# Altium PCB MPPT_Power_Board.PcbDoc (part 2 of 2)
Units mm, origin at the board's own origin, x right, y up, seen from the top; angles counter-clockwise.
Board outline 137.01 x 102.01 mm, 2 copper layers (Top Layer, Bottom Layer), stack 2.14 mm thick; 111 components, 74 nets, 392 pads, 366 vias.
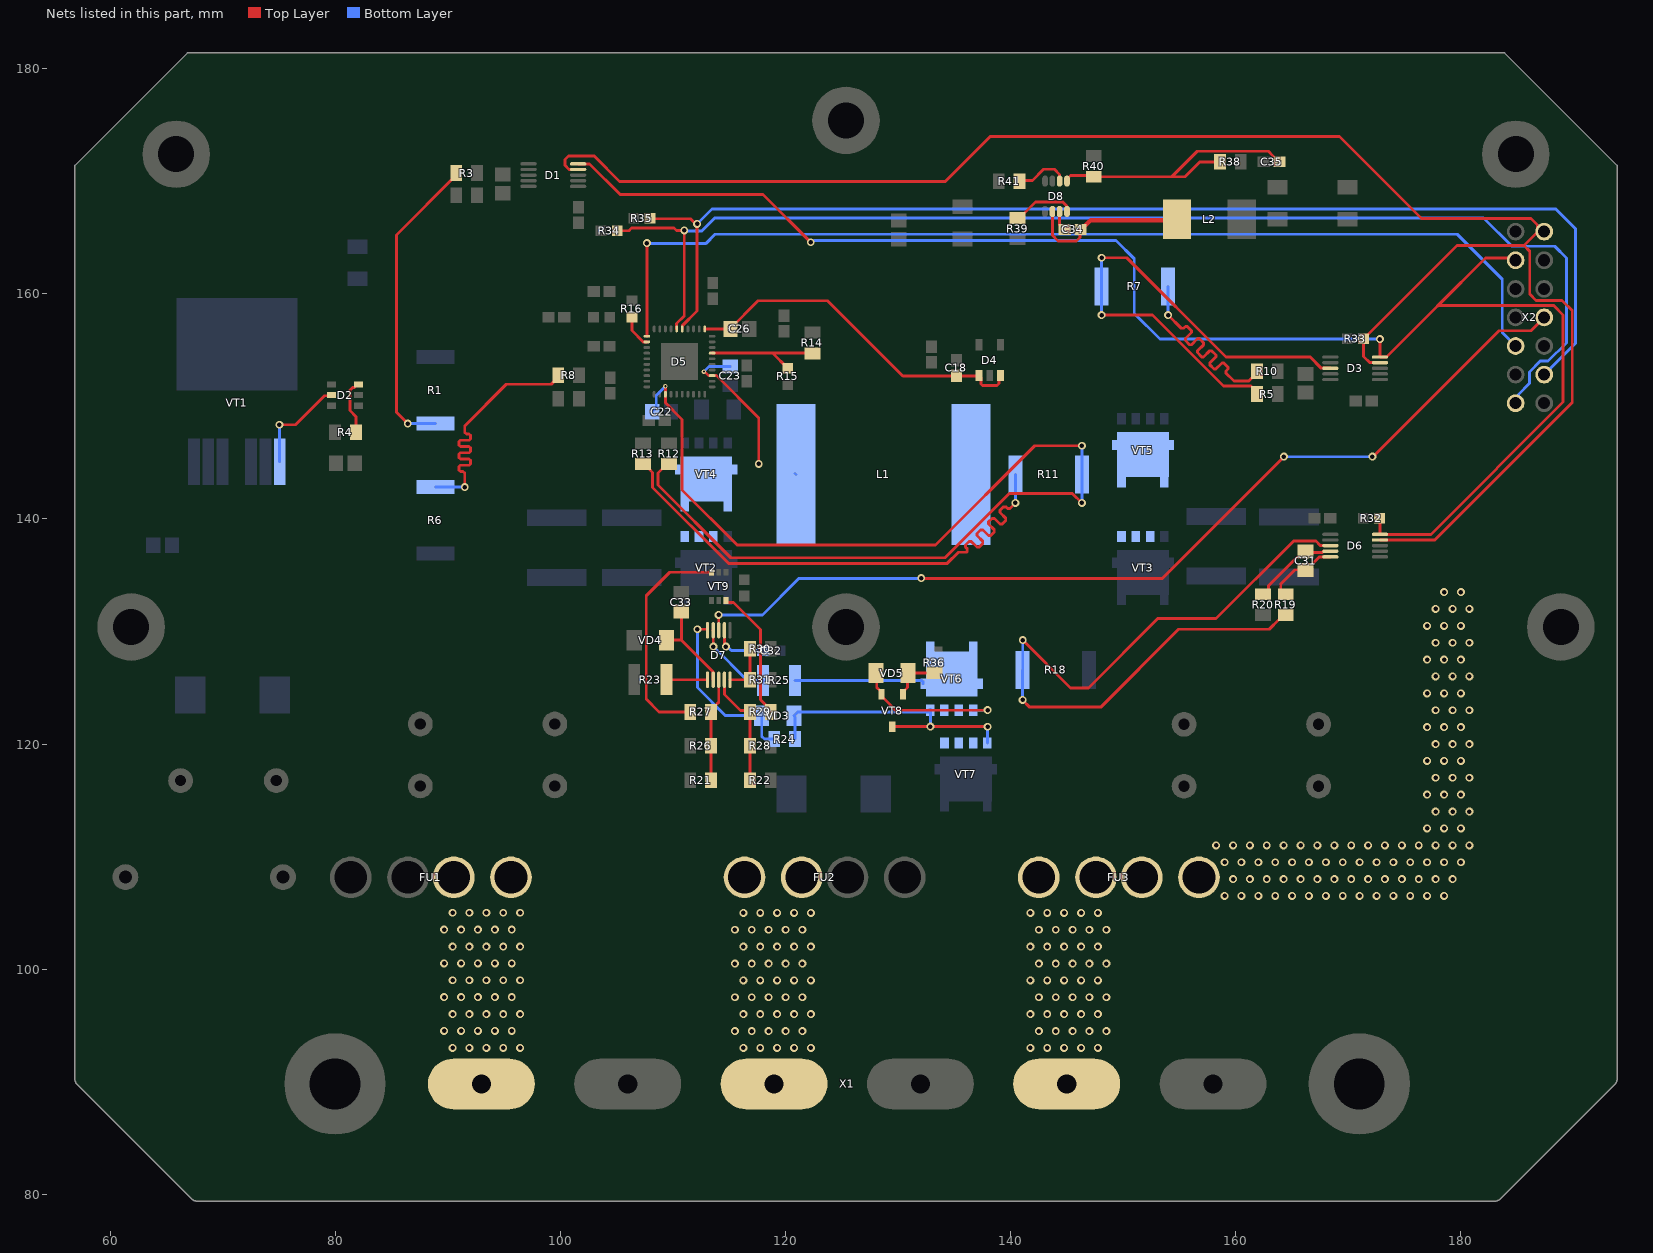
[diagram p2: the nets of this part, all layers, seen from the top]

## Via types
v1: diameter 0.7, hole 0.4, Top Layer to Bottom Layer, 303 vias
v2: diameter 0.7/0.7 (per signal layer), hole 0.4, Top Layer to Bottom Layer, 45 vias
v3: diameter 0.5, hole 0.2, Top Layer to Bottom Layer, 9 vias
v4: diameter 0.4/0.4 (per signal layer), hole 0.2, Top Layer to Bottom Layer, 9 vias

## Nets (pads, with @x,y where several pads share a name; then routed paths per layer and width w, separated by ;. In a path a pad name is that pad's centre, name@x,y a point inside that pad or via, vN(x,y) a via of type N, cw(c..) or ccw(c..) an arc to the next point about the centre after c; other vN are vias at no path point) (continued)
NetC31_1: C31.1 D6.9 R20.1 | length 7.8
  Top Layer w0.254: R20.1@162.425,133.3 162.509,133.3 162.907,133.698 162.907,134.057 165.445,136.596 165.696,136.596 C31.1@166.194,137.094 166.27,137.018 167.705,137.018 167.813,137.125 D6.9@168.4,137.125
NetC31_2: C31.2 D6.10 R19.1 | length 6.6
  Top Layer w0.254: R19.1@164.425,133.3 164.386,133.3 163.988,133.698 163.988,134.206 165.262,135.48 166.158,135.48 C31.2@166.194,135.444 166.269,135.444 166.767,135.942 166.767,135.974 167.409,136.616 168.391,136.616 D6.10@168.4,136.625
NetC32_1: C32.1 D7.7 | length 5
  Top Layer w0.26: D7.7@114.568,130.106 114.568,128.911 114.7,128.778 v2(114.7,128.659)
  Bottom Layer w0.26: v2(114.7,128.659) 114.819,128.659 115.184,128.294 C32.1@118.025,128.294
NetC33_2: C33.2 D7.2 VD4.2 | length 8.6
  Top Layer w0.26: VD4.2@109.416,129.227 110.76,129.227 ; C33.2@110.731,131.769 110.76,131.74 110.76,129.227 ; D7.2@113.567,125.706 113.56,125.714 113.56,126.426 110.76,129.227
NetC34_1: C34.1 D8.7 | length 1.8
  Top Layer w0.254: D8.7@144.351,167.307 144.351,166.093 144.731,165.714 C34.1@144.806,165.714
NetC34_2: C34.2 D8.6 L2.1 | length 14.5
  Top Layer w0.254: D8.6@143.701,167.307 143.701,165.19 144.198,164.694 145.847,164.694 146.16,165.006 146.16,165.668 C34.2@146.206,165.714 C34.2@146.281,165.714
  Top Layer w0.4: C34.2@146.281,165.714 147.117,166.55 L2.1@154.689,166.55
NetC35_2: C35.2 D8.1 R38.2 R40.1 | length 25.4
  Top Layer w0.254: D8.1@145.001,170.007 145.001,170.19 145.323,170.512 147.261,170.512 R40.1@147.384,170.389 154.314,170.389 ; R38.2@158.591,171.725 158.562,171.696 156.8,171.696 155.493,170.389 154.314,170.389 ; C35.2@163.875,171.731 163.794,171.731 163.254,172.271 163.254,172.295 162.895,172.654 156.579,172.654 154.314,170.389
NetD2_3: D2.3 R4.2 | length 4.9
  Top Layer w0.254: R4.2@81.825,147.7 81.822,147.703 81.822,149.089 81.294,149.617 81.294,151.433 81.517,151.656 81.653,151.656 81.656,151.656 81.95,151.95 D2.3@82.075,151.95
NetD2_5: D2.5 VT1.1 | length 9
  Top Layer w0.254: v2(75.038,148.362) 76.461,148.362 79.043,150.944 79.619,150.944 D2.5@79.675,151
  Bottom Layer w0.254: v2(75.038,148.362) 75.049,148.351 75.049,145.086 VT1.1@75.06,145.075
NetD3_8: D3.8 R1.2 R3.2 R5.1 R6.1 R7.1 R8.1 | length 97
  Top Layer w0.254: v2(86.434,148.466) 85.434,149.467 85.434,165.232 90.75,170.549 R3.2@90.75,170.724 ; v2(91.5,142.827) 91.5,144.062 91.351,144.21 91.111,144.21 91,144.321 91,144.654 91.111,144.764 91.889,144.764 92,144.875 92,145.208 91.889,145.318 91.111,145.318 91,145.429 91,145.762 91.111,145.872 91.889,145.872 92,145.983 92,146.316 91.889,146.426 91.111,146.426 91,146.537 91,146.87 91.111,146.98 91.889,146.98 92,147.091 92,147.424 91.889,147.534 91.649,147.534 91.5,147.683 91.5,148.256 91.5,148.264 95.192,151.956 99.177,151.956 99.792,152.571 R8.1@99.792,152.775 ; v2(148.075,158.1) 152.605,158.1 158.898,151.807 161.338,151.807 161.879,151.266 R5.1@161.879,151.091 ; v2(148.075,163.2) 150.311,163.2 159.135,154.376 166.607,154.376 167.595,153.388 168.391,153.388 D3.8@168.4,153.379
  Bottom Layer w0.25: v2(86.434,148.466) R1.2@88.891,148.466 ; R6.1@88.902,142.827 v2(91.5,142.827) ; v2(148.075,158.1) R7.1@148.075,160.65
  Bottom Layer w0.254: R1.2@88.891,148.466 R1.2@88.9,148.475 ; R6.1@88.9,142.825 R6.1@88.902,142.827 ; R7.1@148.075,160.65 v2(148.075,163.2)
NetD5_12: D5.12 R16.1 | length 2.9
  Top Layer w0.254: R16.1@106.35,157.925 106.35,156.735 107.36,155.725 D5.12@107.675,155.725
NetD5_37: D5.37 R14.2 R15.1 | length 10.8
  Top Layer w0.254: D5.37@113.475,154.725 118.85,154.725 R15.1@120.2,153.375 ; 118.85,154.723 122.366,154.723 R14.2@122.386,154.703
NetD6_8: D6.8 R18.1 R19.2 R25.2 VT6.2 | length 78.8
  Top Layer w0.254: v2(141.05,123.92) 141.698,123.272 147.996,123.272 154.921,130.198 162.976,130.198 163.83,131.052 164.027,131.052 R19.2@164.425,131.45 R19.2@164.6,131.45 ; v2(141.069,129.229) 145.312,124.986 146.917,124.986 153.067,131.136 158.253,131.136 165.142,138.025 167.11,138.025 167.5,137.634 168.391,137.634 D6.8@168.4,137.625
  Bottom Layer w0.254: R25.2@120.85,125.65 132.105,125.65 132.225,125.53 VT6.2@132.225,125.348 ; v2(141.05,123.92) R18.1@141.05,126.575 141.069,126.594 v2(141.069,129.229)
NetD7_1: D7.1 R23.2 | length 3.7
  Top Layer w0.254: R23.2@109.411,125.714 109.419,125.706 D7.1@113.068,125.706
NetD7_3: D7.3 R21.2 R26.1 R27.1 | length 9.2
  Top Layer w0.254: R21.2@113.387,116.771 R26.1@113.387,119.843 R27.1@113.387,122.846 113.785,123.244 113.785,123.425 114.068,123.707 D7.3@114.068,125.706
NetD7_4: D7.4 R22.2 R28.1 R29.1 | length 10.3
  Top Layer w0.254: D7.4@114.568,125.706 114.576,125.697 114.576,124.406 116,122.983 116.672,122.983 R29.1@116.825,122.83 ; R22.2@116.841,116.771 R28.1@116.841,119.843 R29.1@116.841,122.846
NetD7_5: D7.5 R30.1 R31.1 | length 4.5
  Top Layer w0.254: D7.5@115.068,125.706 116.834,125.706 R31.1@116.841,125.714
  Top Layer w0.26: R31.1@116.841,125.714 R30.1@116.841,128.46
NetD7_9: D7.9 R25.1 | length 7.1
  Top Layer w0.25: v2@113.576,128.676 D7.9@113.576,130.097
  Top Layer w0.254: D7.9@113.567,130.106 D7.9@113.576,130.097
  Bottom Layer w0.254: v2(113.593,128.659) 116.603,125.65 R25.1@118,125.65
NetD7_10: D7.10 R24.1 VD3.2 | length 15.9
  Top Layer w0.25: v2(112.171,130.195) D7.10@113.046,130.195
  Top Layer w0.254: D7.10@113.046,130.195 113.055,130.187 D7.10@113.055,130.119
  Bottom Layer w0.254: v2(112.171,130.195) 112.171,125.018 114.672,122.517 VD3.2@117.88,122.517 117.88,120.671 118.114,120.437 R24.1@119,120.437
NetD8_2: D8.2 R41.2 | length 4.8
  Top Layer w0.254: R41.2@140.781,170 140.84,170.06 141.923,170.06 142.923,171.059 143.878,171.059 144.332,170.606 144.332,170.026 D8.2@144.351,170.007
NetD8_8: D8.8 R39.1 | length 5.6
  Top Layer w0.254: R39.1@140.606,166.721 140.781,166.721 142.21,168.15 144.625,168.15 144.954,167.821 144.954,167.354 D8.8@145.001,167.307
NetFU1_1: FU1.1 X1.1
  other v1: 90.421,93.01 91.921,93.01 93.421,93.01 94.921,93.01 96.421,93.01 89.671,94.51 91.171,94.51 92.671,94.51 94.171,94.51 95.671,94.51 90.421,96.01 91.921,96.01 93.421,96.01 94.921,96.01 96.421,96.01 89.671,97.51 91.171,97.51 92.671,97.51 94.171,97.51 95.671,97.51 90.421,99.01 91.921,99.01 93.421,99.01 94.921,99.01 96.421,99.01 89.671,100.51 91.171,100.51 92.671,100.51 94.171,100.51 95.671,100.51 90.421,102.01 91.921,102.01 93.421,102.01 94.921,102.01 96.421,102.01 89.671,103.51 91.171,103.51 92.671,103.51 94.171,103.51 95.671,103.51 90.421,105.01 91.921,105.01 93.421,105.01 94.921,105.01 96.421,105.01
NetFU2_1: FU2.1 X1.3
  other v1: 116.25,93 117.75,93 119.25,93 120.75,93 122.25,93 115.5,94.5 117,94.5 118.5,94.5 120,94.5 121.5,94.5 116.25,96 117.75,96 119.25,96 120.75,96 122.25,96 115.5,97.5 117,97.5 118.5,97.5 120,97.5 121.5,97.5 116.25,99 117.75,99 119.25,99 120.75,99 122.25,99 115.5,100.5 117,100.5 118.5,100.5 120,100.5 121.5,100.5 116.25,102 117.75,102 119.25,102 120.75,102 122.25,102 115.5,103.5 117,103.5 118.5,103.5 120,103.5 121.5,103.5 116.25,105 117.75,105 119.25,105 120.75,105 122.25,105
NetFU3_1: FU3.1 X1.5
  other v1: 141.75,93 143.25,93 144.75,93 146.25,93 147.75,93 142.5,94.5 144,94.5 145.5,94.5 147,94.5 148.5,94.5 141.75,96 143.25,96 144.75,96 146.25,96 147.75,96 142.5,97.5 144,97.5 145.5,97.5 147,97.5 148.5,97.5 141.75,99 143.25,99 144.75,99 146.25,99 147.75,99 142.5,100.5 144,100.5 145.5,100.5 147,100.5 148.5,100.5 141.75,102 143.25,102 144.75,102 146.25,102 147.75,102 142.5,103.5 144,103.5 145.5,103.5 147,103.5 148.5,103.5 141.75,105 143.25,105 144.75,105 146.25,105 147.75,105
NetFU3_2: FU3.2 R7.2 R10.1 | length 19.2
  Top Layer w0.254: v2(153.975,158.1) 155.145,156.93 155.356,156.93 155.523,157.097 155.685,157.097 156.063,156.719 156.063,156.557 155.518,156.012 155.518,155.85 155.896,155.472 156.058,155.472 156.603,156.017 156.766,156.017 157.144,155.638 157.144,155.476 156.599,154.931 156.599,154.769 156.977,154.391 157.139,154.391 157.684,154.936 157.846,154.936 158.224,154.558 158.224,154.396 157.679,153.851 157.679,153.689 158.057,153.311 158.219,153.311 158.764,153.856 158.926,153.856 159.305,153.478 159.305,153.315 159.137,153.148 159.137,152.938 159.736,152.339 159.828,152.247 161.144,152.247 161.43,152.533 161.481,152.533 161.879,152.931 R10.1@161.879,153.106
  Bottom Layer w0.25: v2(153.975,158.1) R7.2@153.975,160.65
  other v1: 159,106.5 160.5,106.5 162,106.5 163.5,106.5 165,106.5 166.5,106.5 168,106.5 169.5,106.5 171,106.5 172.5,106.5 174,106.5 175.5,106.5 177,106.5 178.5,106.5 159.75,108 161.25,108 162.75,108 164.25,108 165.75,108 167.25,108 168.75,108 170.25,108 171.75,108 173.25,108 174.75,108 176.25,108 177.75,108 179.25,108 159,109.5 160.5,109.5 162,109.5 163.5,109.5 165,109.5 166.5,109.5 168,109.5 169.5,109.5 171,109.5 172.5,109.5 174,109.5 175.5,109.5 177,109.5 178.5,109.5 180,109.5 158.25,111 159.75,111 161.25,111 162.75,111 164.25,111 165.75,111 167.25,111 168.75,111 170.25,111 171.75,111 173.25,111 174.75,111 176.25,111 177.75,111 179.25,111 180.75,111 177,112.5 178.5,112.5 180,112.5 177.75,114 179.25,114 180.75,114 177,115.5 178.5,115.5 180,115.5 177.75,117 179.25,117 180.75,117 177,118.5 178.5,118.5 180,118.5 177.75,120 179.25,120 180.75,120 177,121.5 178.5,121.5 180,121.5 177.75,123 179.25,123 180.75,123 177,124.5 178.5,124.5 180,124.5 177.75,126 179.25,126 180.75,126 177,127.5 178.5,127.5 180,127.5 177.75,129 179.25,129 180.75,129 177,130.5 178.5,130.5 180,130.5 177.75,132 179.25,132 180.75,132 178.5,133.5 180,133.5
NetL1_2: L1.2 R11.1 R13.1 | length 48
  Top Layer w0.254: R13.1@107.325,144.875 107.5,144.875 107.898,144.477 107.898,144.412 108.189,144.12 108.189,142.782 114.92,136.051 134.369,136.051 135.359,137.041 136.046,137.041 136.135,137.13 136.135,137.341 135.989,137.487 135.989,137.692 136.297,137.999 136.501,137.999 137.004,137.496 137.209,137.496 137.516,137.804 137.516,138.008 137.013,138.511 137.013,138.715 137.321,139.023 137.525,139.023 138.028,138.52 138.232,138.52 138.54,138.827 138.54,139.032 138.037,139.535 138.037,139.739 138.344,140.047 138.549,140.047 139.052,139.544 139.256,139.544 139.563,139.851 139.563,140.056 139.061,140.558 139.061,140.763 139.368,141.07 139.573,141.07 139.719,140.924 139.929,140.924 v2(140.425,141.42)
  Bottom Layer w0.254: v2(140.425,141.42) R11.1@140.425,143.95
NetR24_2: R24.2 VD3.1 VT6.1 VT7.1 VT8.3 | length 25.8
  Top Layer w0.254: VT8.3@129.475,121.525 129.503,121.553 v2(132.875,121.553) 132.887,121.542 137.938,121.542 v2(137.949,121.53)
  Bottom Layer w0.25: VT7.1@137.93,120.095 137.949,120.114 v2(137.949,121.53)
  Bottom Layer w0.254: R24.2@120.85,120.437 120.85,122.407 VD3.1@120.74,122.517 121.077,122.855 132.695,122.855 VT6.1@132.845,123.005 ; v2@132.86,121.568 VT6.1@132.86,122.99
  Bottom Layer w0.4: VT6.1@132.845,123.005 VT6.1@132.86,122.99 ; v2@132.86,121.568 v2(132.875,121.553)
NetR27_2: R27.2 VT9.6 | length 20.2
  Top Layer w0.254: R27.2@111.537,122.846 108.763,122.846 107.625,123.984 107.625,133.164 109.717,135.256 VT9.6@113.417,135.256
NetR29_2: R29.2 VT9.3 | length 11.9
  Top Layer w0.254: VT9.3@114.717,132.756 114.717,132.666 114.8,132.583 115.376,132.583 117.774,130.185 117.774,123.939 118.691,123.021 R29.2@118.691,122.846
NetR36_1: R36.1 VD5.2 VT8.1 | length 4.4
  Top Layer w0.254: VT8.1@130.425,124.425 130.425,124.62 130.505,124.7 130.508,124.7 130.842,125.034 130.842,126.262 VD5.2@130.88,126.3 R36.1@133.225,126.3
NetVD5_1: VD5.1 VT6.3 VT7.3 VT8.2 | length 13.5
  Top Layer w0.254: VD5.1@128.02,126.3 128.099,126.221 128.099,125.034 128.433,124.7 128.445,124.7 128.525,124.62 VT8.2@128.525,124.425 128.525,124.23 128.678,124.077 128.693,124.077 129.765,123.005 v2(137.949,123.005)
  Bottom Layer w0.254: VT6.3@136.655,123.005 v2(137.949,123.005)
NFLT: D5.11 X2.9 | length 92.4
  Top Layer w0.254: D5.11@107.675,156.225 v2@107.675,164.181
  Bottom Layer w0.254: v2(107.675,164.5) 107.727,164.448 112.902,164.448 113.742,165.288 179.669,165.288 183.669,161.288 183.669,156.543 X2.9@184.856,155.356
NPGD: D7.8 X2.8 | length 85.7
  Top Layer w0.25: D7.8@114.06,130.113 v2@114.06,131.455
  Top Layer w0.254: D7.8@114.06,130.113 D7.8@114.068,130.106 ; v2(132.05,134.745) 132.086,134.709 153.459,134.709 v2(164.275,145.525) ; v2(172.125,145.525) 172.195,145.525 183.38,156.71 186.21,156.71 X2.8@187.396,157.896
  Bottom Layer w0.254: v2(114.053,131.462) 117.937,131.462 121.164,134.689 131.993,134.689 v2(132.05,134.745) ; v2(164.275,145.525) v2(172.125,145.525)
SCL_1: D1.5 D3.5 D6.5 R32.1 X2.3 | length 140.2
  Top Layer w0.254: D1.5@101.571,171.54 102.576,171.54 105.307,168.809 118.003,168.809 v2(122.236,164.577) ; R32.1@172.768,140.06 172.8,140.028 D6.5@172.8,138.625 177.334,138.625 189.079,150.369 189.079,158.123 188.261,158.941 177.937,158.941 ; v2(172.8,155.975) D3.5@172.8,154.379 173.375,154.379 177.779,158.783 177.937,158.941 ; X2.3@184.604,162.723 X2.3@184.856,162.976 184.645,163.187 182.183,163.187 177.937,158.941
  Bottom Layer w0.254: v2(122.236,164.577) 122.357,164.577 122.511,164.731 149.349,164.731 150.975,163.105 150.975,158.255 153.256,155.975 v2(172.8,155.975)
SCL_2: D5.6 R34.1 X2.13 | length 110.4
  Top Layer w0.254: R34.1@105.046,165.597 106.079,165.597 106.327,165.846 110.091,165.846 110.308,165.629 v2@110.992,165.629 ; D5.6@110.325,156.875 110.325,157.353 111,158.028 v2@111,165.31
  Bottom Layer w0.254: v2(111,165.621) 111.045,165.576 112.552,165.576 113.711,166.734 182.011,166.734 184.525,164.22 188.329,164.22 189.367,163.183 189.367,155.636 187.746,154.015 187.049,154.015 186.096,153.062 186.096,152.049 185.109,151.062 185.109,150.529 X2.13@184.856,150.276
SDA_1: D1.4 D3.4 D6.4 R33.1 X2.2 | length 156.7
  Top Layer w0.254: D1.4@101.571,171.04 101.562,171.049 100.772,171.049 100.406,171.415 100.406,171.926 100.709,172.23 102.999,172.23 105.247,169.982 134.191,169.982 138.184,173.975 169.201,173.975 176.49,166.687 186.226,166.687 186.811,166.101 186.811,165.486 185.601,164.276 ; R33.1@171.347,155.99 171.347,154.44 171.898,153.888 172.791,153.888 D3.4@172.8,153.879 ; R33.1@171.356,155.999 171.698,156.341 171.704,156.341 179.639,164.276 185.601,164.276 ; D6.4@172.8,138.125 177.673,138.125 189.883,150.335 189.883,158.51 188.982,159.411 186.669,159.411 186.108,159.971 186.108,163.769 185.601,164.276
SDA_2: D5.5 R35.1 X2.12 | length 107.4
  Top Layer w0.254: R35.1@107.958,166.714 108.005,166.668 111.551,166.668 112.019,166.2 v2(112.14,166.2) ; D5.5@110.825,156.875 110.825,157.15 112.14,158.465 v2@112.14,165.87
  Bottom Layer w0.254: v2(112.14,166.2) 113.479,167.538 188.418,167.538 190.191,165.765 190.191,155.611 X2.12@187.396,152.816
SW1: C22.2 D5.23 R11.2 R12.1 VT3.3 VT5.2 | length 104.3
  Top Layer w0.254: v4(109.325,151.785) D5.23@109.325,151.075 109.325,150.31 110.807,148.828 110.807,142.568 115.708,137.666 133.305,137.666 142.137,146.498 v2@146.321,146.498 ; R12.1@109.65,144.875 109.475,144.875 108.668,144.068 108.668,143.008 115.13,136.546 134.15,136.546 139.871,142.268 145.475,142.268 v2(146.323,141.42)
  Bottom Layer w0.254: C22.2@108.155,149.525 108.511,149.88 108.511,150.971 v4(109.325,151.785) ; v2(146.323,141.42) 146.323,143.952 v2(146.323,146.5)
SW2: C23.2 D5.33 L1.1 VT2.3 VT4.2 | length 13.3
  Top Layer w0.254: v4(112.744,153.09) 112.783,153.09 113.146,152.727 113.473,152.727 D5.33@113.475,152.725 113.867,152.725 117.616,148.976 v2@117.616,144.881
  Bottom Layer w0.254: v4(112.744,153.09) 113.202,153.548 C23.2@115.089,153.548 ; L1.1@120.85,144.025 L1.1@120.925,143.95
  other v2: 117.622,144.875
VCC1: C18.2 C26.1 D4.1 D4.3 D5.1 | length 31.4
  Top Layer w0.254: D5.1@112.825,156.875 115.05,156.875 117.555,159.38 123.737,159.38 130.417,152.7 135.179,152.7 C18.2@135.183,152.704 137.158,152.704 D4.1@137.183,152.729 137.356,152.556 137.356,152.009 137.505,151.86 138.78,151.86 138.951,152.031 138.951,152.597 D4.3@139.083,152.729
pads on no net: D4.4 D5.26 D5.34 D5.35 D5.39

## Polygon pours and split planes (outlines as drawn)
AGND on Bottom Layer "AGND_L02_P046" (solid, remove dead copper, pour order 46): 67.688,180.387 67.488,180.387 58.025,170.925 58.062,90.212 58.15,90.125 67.707,80.567 67.722,80.552 182.852,80.552 192.669,90.76 192.669,171.175 192.669,171.35 183.631,180.387
SW2 on Bottom Layer "SW2_L02_P016" (solid, remove dead copper, pour order 16): 109.979,139.534 cw(c103.073,139.534) 109.97,139.175 ccw(c111.387,139.101) 110.409,138.072 ccw(c111.157,139.121) 111.376,137.852 113.674,137.852 ccw(c113.769,138.398) 114.088,137.944 ccw(c113.599,138.348) 114.23,138.408 114.23,139.572 cw(c115.042,139.572) 114.468,140.145 cw(c115.133,139.48) 115.133,140.421 115.521,140.421 ccw(c115.521,141.087) 115.992,140.616 116.061,140.685 ccw(c115.726,141.02) 116.199,141.02 116.199,144.581 ccw(c115.281,144.581) 115.93,145.23 ccw(c115.249,144.55) 115.249,145.512 110.719,145.512 ccw(c110.719,144.725) 110.162,145.282 ccw(c110.603,144.841) 109.979,144.841 109.979,140.044
SW1 on Bottom Layer "SW1_L02_P025" (solid, remove dead copper, pour order 25): 146.776,145.622 147.078,145.622 ccw(c147.011,147.013) 148.042,146.077 148.927,147.279 cw(c149.859,146.347) 149.859,147.665 154.141,147.665 cw(c154.141,146.613) 154.884,147.357 cw(c154.584,147.057) 155.009,147.056 155.009,143.07 cw(c154.215,143.07) 154.776,142.509 cw(c154.502,142.783) 154.502,142.396 153.783,142.396 ccw(c153.782,141.99) 153.496,142.277 ccw(c154.722,141.051) 152.988,141.051 152.988,138.111 cw(c152.674,138.111) 152.896,137.889 cw(c152.818,137.967) 152.817,137.857 149.37,137.857 cw(c149.37,138.502) 148.913,138.046 cw(c149.85,138.983) 148.525,138.983 148.525,140.684 ccw(c147.869,140.684) 148.376,141.1 147.692,141.934 ccw(c146.833,141.026) 146.775,142.275 146.775,145.625
BATT_OUT on Bottom Layer "BATT_OUT_L02_P030" (solid, remove dead copper, pour order 30): 147.35,128.25 148.022,128.25 cw(c148.022,126.373) 149.35,127.7 151.056,125.994 ccw(c152.852,127.79) 152.852,125.25 166.025,125.25 ccw(c162.482,130.825) 168.673,128.522 ccw(c163.548,128.064) 167.825,130.925 ccw(c163.77,125.518) 164.732,132.208 149.771,132.208 cw(c149.771,133.029) 149.19,132.449 cw(c150.33,133.588) 148.718,133.588 148.718,136.296 cw(c149.318,136.296) 148.894,136.72 cw(c149.49,136.124) 149.49,136.967 170.481,136.967 cw(c170.481,134.428) 172.277,136.223 173.185,135.315 cw(c171.39,133.519) 173.929,133.519 173.929,123.456 cw(c171.39,123.456) 173.185,121.66 172.044,120.519 cw(c170.248,122.314) 170.248,119.775 154.57,119.775 cw(c154.57,127.187) 149.329,121.946 cw(c150.908,123.525) 148.675,123.525 ccw(c146.77,123.261) 148.1,124.65 ccw(c146.75,122.281) 147.508,124.9 147.35,124.9 147.35,128.247
BATT_IN on Bottom Layer "BATT_IN_L02_P036" (solid, remove dead copper, pour order 36): 123.656,108.065 123.656,115.879 cw(c126.196,115.879) 124.4,117.675 124.983,118.258 cw(c126.779,116.462) 126.779,119.002 138.279,119.002 cw(c138.279,117.38) 139.425,118.527 cw(c138.92,118.021) 139.635,118.021 139.635,114.447 cw(c138.49,114.447) 139.3,113.638 cw(c138.389,114.549) 138.389,113.261 133.517,113.261 ccw(c133.517,112.16) 132.738,112.938 132.675,112.875 ccw(c133.171,112.379) 132.469,112.379 132.469,107.385 cw(c129.929,107.385) 131.725,105.589 131.534,105.397 cw(c130.893,106.038) 130.893,105.132 125.332,105.132 cw(c125.332,106.885) 124.092,105.645 123.991,105.746 cw(c124.795,106.551) 123.658,106.551 123.658,108.53
DC/DC_IN on Bottom Layer "DC/DC_IN_L02_P033" (solid, pour order 33): 87.225,136.5 cw(c85.113,136.5) 86.606,135.006 84.094,132.494 ccw(c85.89,130.698) 83.35,130.698 83.35,122.175 ccw(c85.342,122.175) 83.933,120.767 84.656,120.044 ccw(c86.452,121.84) 86.452,119.3 100.448,119.3 ccw(c100.448,121.84) 102.244,120.044 102.925,120.725 ccw(c102.201,121.449) 103.225,121.449 103.225,129.448 cw(c105.765,129.448) 103.969,131.244 104.097,131.372 cw(c105.893,129.576) 105.893,132.116 115.115,132.116 ccw(c115.115,133.228) 115.902,132.442 ccw(c115.368,132.976) 116.123,132.976 116.123,136.73 ccw(c115.619,136.73) 115.975,137.087 115.865,137.197 ccw(c115.642,136.975) 115.642,137.29 107.563,137.29 107.557,137.284 107.553,137.288 97.68,137.288 ccw(c97.68,136.22) 96.925,136.975 ccw(c98.434,135.466) 96.3,135.466 96.3,126.599 cw(c94.251,126.599) 95.7,125.15 cw(c94.915,125.935) 94.915,124.825 89.45,124.825 cw(c89.45,125.489) 88.981,125.019 88.494,125.506 cw(c90.29,127.302) 87.75,127.302 87.75,129.925 cw(c89.259,129.925) 88.192,130.992 89.831,132.631 ccw(c88.035,134.427) 90.575,134.427 90.575,136.5
SW2 on Bottom Layer "SW2_L02_P019" (solid, remove dead copper, pour order 19): 115.133,140.421 116.152,140.421 cw(c116.152,137.881) 117.948,139.677 118.1,139.525 cw(c116.772,138.197) 118.65,138.197 118.65,138.079 ccw(c119.504,138.079) 118.9,137.475 ccw(c119.322,137.897) 119.322,137.3 122.734,137.3 ccw(c122.734,137.641) 122.975,137.4 ccw(c122.794,137.581) 123.05,137.581 123.05,150.036 ccw(c122.111,150.036) 122.775,150.7 ccw(c122.253,150.178) 122.253,150.916 119.688,150.916 ccw(c119.688,149.837) 118.925,150.6 ccw(c120.268,149.257) 118.369,149.257 118.369,147.367 cw(c116.683,147.367) 117.875,146.175 cw(c116.195,147.855) 116.195,145.479 115.511,145.479 115.511,141.55 cw(c113.908,141.55) 115.041,140.416
NetD6_8 on Bottom Layer "NETD6_8_L02_P035" (solid, pour order 35): 140.634,128.249 139.61,128.249 cw(c139.61,129.96) 138.4,128.75 ccw(c136.671,127.021) 136.671,129.466 133.096,129.466 ccw(c133.096,127.931) 132.01,129.017 ccw(c132.817,128.073) 131.579,128.169 131.579,125.239 ccw(c132.857,125.355) 132.035,124.369 132.129,124.275 ccw(c132.847,124.751) 132.676,123.907 137.12,123.907 ccw(c136.948,125.285) 138.044,124.432 cw(c139.174,123.303) 139.174,124.9 140.625,124.9 140.625,128.25
NetC2_2 on Bottom Layer "NETC2_2_L02_P039" (solid, remove dead copper, pour order 39): 88.309,108.103 88.309,110.207 ccw(c86.657,110.207) 87.825,111.375 ccw(c86.376,109.926) 86.376,111.975 80.477,111.975 cw(c80.477,114.515) 78.681,112.719 78.1,113.3 cw(c78.885,114.085) 77.775,114.085 77.775,135.698 ccw(c75.235,135.698) 77.031,137.494 75.034,139.491 cw(c76.83,141.287) 74.29,141.287 74.29,147.251 ccw(c73.186,147.251) 73.967,148.033 ccw(c73.261,147.327) 73.261,148.325 67.28,148.325 ccw(c67.28,146.02) 65.65,147.65 ccw(c66.254,147.046) 65.4,147.046 65.4,137.352 ccw(c67.94,137.352) 66.144,135.556 69.731,131.969 cw(c67.935,130.173) 70.475,130.173 70.475,106.802 ccw(c73.015,106.802) 71.219,105.006 72.225,104 ccw(c73.432,105.207) 73.432,103.5 85.323,103.5 ccw(c85.323,106.04) 87.119,104.244 87.56,104.685 ccw(c85.764,106.481) 88.304,106.481 88.304,108.094
NetVD5_1 on Bottom Layer "NETVD5_1_L02_P041" (solid, remove dead copper, pour order 41): 133.489,123.013 133.489,123.321 cw(c133.769,123.321) 133.571,123.518 cw(c133.941,123.249) 133.87,123.701 136.989,123.701 cw(c136.925,123.254) 137.287,123.525 cw(c137.172,123.409) 137.334,123.409 137.334,119.778 cw(c136.995,119.778) 137.235,119.538 cw(c136.826,119.947) 136.826,119.368 133.916,119.368 cw(c133.916,119.834) 133.587,119.505 cw(c133.824,119.741) 133.489,119.741 133.489,123.031
NetFU3_2 on Bottom Layer "NETFU3_2_L02_P037" (solid, remove dead copper, pour order 37): 154.4,162.325 155.273,162.325 ccw(c155.273,162.752) 155.575,162.45 cw(c157.265,160.76) 157.265,163.15 178.868,163.15 cw(c178.868,161.443) 180.075,162.65 181.331,161.394 cw(c179.535,159.598) 182.075,159.598 182.075,109.077 cw(c179.535,109.077) 181.331,107.281 180.144,106.094 cw(c178.348,107.89) 178.348,105.35 151.714,105.35 cw(c151.714,107.353) 150.298,105.937 cw(c151.473,107.112) 149.811,107.112 149.811,109.398 cw(c152.351,109.398) 150.555,111.195 150.829,111.468 cw(c152.289,110.008) 152.289,112.073 173.071,112.073 ccw(c173.071,114.613) 174.867,112.817 175.95,113.9 ccw(c175.407,114.443) 176.175,114.443 176.175,154.937 ccw(c173.635,154.937) 175.431,156.733 174.608,157.556 ccw(c172.812,155.76) 172.812,158.3 156.886,158.3 cw(c156.886,159.836) 155.8,158.75 ccw(c155.257,158.207) 155.257,158.975 154.425,158.975 154.425,162.265 ccw(c154.34,162.265)
NetL1_2 on Bottom Layer "NETL1_2_L02_P021" (solid, remove dead copper, pour order 21): 136,137.325 137.992,137.325 ccw(c137.992,137.786) 138.318,137.46 ccw(c137.783,137.995) 138.539,137.995 138.539,141.288 cw(c139.478,141.288) 138.814,141.952 cw(c139.606,141.16) 139.606,142.28 139.955,142.28 139.955,145.62 139.771,145.62 cw(c139.771,146.746) 138.975,145.95 cw(c140.001,146.976) 138.55,146.976 138.55,150.098 ccw(c138.123,150.098) 138.425,150.4 ccw(c137.843,149.818) 137.843,150.641 134.97,150.641 ccw(c134.97,149.828) 134.395,150.403 134.334,150.342 ccw(c134.76,149.916) 134.157,149.916 134.157,138.02 ccw(c134.812,138.02) 134.349,137.557 ccw(c134.91,138.118) 134.91,137.325 136,137.325
NetD3_8 on Bottom Layer "NETD3_8_L02_P010" (solid, remove dead copper, pour order 10): 90.673,147.269 cw(c91.199,146.811) 90.889,147.436 ccw(c91.515,148.154) 91.449,147.204 91.515,147.204 ccw(c91.635,152.307) 95.109,148.566 ccw(c91.876,150.891) 95.825,151.4 95.825,159.15 98.431,162.456 cw(c100.227,160.66) 100.227,163.2 144.893,163.2 cw(c144.893,161.494) 146.1,162.7 ccw(c147.005,163.605) 147.005,162.325 147.724,162.325 147.724,158.978 147.027,158.978 ccw(c147.026,157.775) 146.175,158.625 cw(c144.908,159.892) 144.908,158.1 103.577,158.1 ccw(c103.577,155.561) 101.781,157.356 101.4,156.975 101.4,146.752 cw(c98.861,146.752) 100.656,144.956 100.521,144.821 cw(c98.902,146.438) 98.902,144.15 92.2,144.15 92.2,144.149 91.448,144.149 90.691,144.149 ccw(c89.234,144.271) 90.436,145.103 90.763,146.451 90.691,146.99 cw(c91.383,147.175)
NetD3_8 on Bottom Layer "NETD3_8_L02_P009" (solid, remove dead copper, pour order 9): 87.225,147.922 cw(c86.628,147.922) 87.05,147.5 ccw(c88.076,146.474) 86.625,146.474 86.625,144.791 ccw(c87.991,144.791) 87.025,143.825 cw(c86.542,143.342) 87.225,143.342 87.225,143.225 90.575,143.225 90.575,143.438 cw(c91.087,143.438) 90.725,143.8 ccw(c89.639,144.886) 91.175,144.886 91.175,146.62 ccw(c89.895,146.62) 90.8,147.525 cw(c91.342,148.067) 90.576,148.067 90.576,148.125 87.225,148.125
NetC4_1 on Bottom Layer "NETC4_1_L02_P002" (solid, remove dead copper, pour order 2): 64.975,152.25 64.975,159.675 cw(c68.057,159.392) 68.34,162.475 88.885,162.475 cw(c88.885,159.935) 91.425,159.935 91.425,159.675 90.575,154.875 87.2,154.875 ccw(c86.375,154.875) 86.375,155.7 79.19,155.7 ccw(c79.401,153.186) 76.887,152.975 76.887,151.563 cw(c76.385,151.562) 76.385,151.06 66.165,151.06 cw(c66.165,152.25)
AGND on Top Layer "AGND_L01_P048" (solid, remove dead copper, pour order 48): 67.689,180.388 67.488,180.388 58.025,170.926 58.062,90.213 58.15,90.125 67.708,80.568 67.722,80.553 182.852,80.553 192.669,90.761 192.669,171.176 192.669,171.351 183.632,180.388
NetFU3_2 on Top Layer "NETFU3_2_L01_P044" (solid, remove dead copper, pour order 44): 182.075,109.077 cw(c179.536,109.077) 181.331,107.281 180.144,106.094 cw(c178.348,107.889) 178.348,105.35 151.714,105.35 cw(c151.714,107.352) 150.298,105.937 cw(c151.473,107.112) 149.811,107.112 149.811,109.398 cw(c152.351,109.398) 150.555,111.195 150.829,111.468 cw(c152.289,110.009) 152.289,112.073 173.071,112.073 ccw(c173.071,114.613) 174.867,112.817 175.95,113.9 ccw(c175.407,114.443) 176.175,114.443 176.175,132.366 cw(c177.958,132.447) 176.668,133.68 cw(c178.191,132.131) 178.15,134.303 ccw(c179.173,234.719) 180.196,134.303 cw(c180.304,132.528) 182.075,132.366
NetC2_2 on Top Layer "NETC2_2_L01_P042" (solid, pour order 42): 77.775,129.442 77.775,135.698 ccw(c75.237,135.699) 77.031,137.494 75.034,139.491 cw(c76.831,141.287) 74.29,141.287 74.29,147.251 ccw(c73.188,147.252) 73.967,148.033 ccw(c73.262,147.329) 73.261,148.325 67.28,148.325 ccw(c67.279,146.023) 65.65,147.65 ccw(c66.252,147.047) 65.4,147.046 65.4,137.352 ccw(c67.94,137.352) 66.144,135.556 69.731,131.969 cw(c67.938,130.174) 70.475,130.173 70.475,129.607 ccw(c73.998,129.541) 70.475,129.475 ccw(c72.013,129.366) 70.788,128.431 ccw(c73.394,130.456) 70.864,128.336 ccw(c73.999,131.559) 71.115,128.109 ccw(c73.012,130.376) 72.995,127.421 75.163,127.409 ccw(c75.183,131.035) 76.659,127.722 ccw(c75.893,129.442)
NetC4_1 on Top Layer "NETC4_1_L01_P043" (solid, pour order 43): 64.975,152.25 64.975,159.675 cw(c68.057,159.392) 68.34,162.475 82.087,162.475 cw(c82.06,159.918) 82.985,162.302 cw(c81.98,160.086) 83.366,162.086 cw(c81.771,160.324) 83.656,161.772 cw(c82.963,161.186) 83.822,161.478 cw(c83.728,161.446) 83.827,161.434 cw(c83.621,161.458) 83.825,161.422 ccw(c83.859,161.416) 83.824,161.413 cw(c83.581,161.393) 83.824,161.369 83.824,157.173 cw(c82.561,157.071) 83.828,157.069 83.828,156.864 cw(c82.587,156.863) 83.824,156.763 cw(c83.105,156.752) 83.536,156.176 cw(c82.167,158.002) 82.154,155.72 79.19,155.7 ccw(c79.401,153.186) 76.887,152.975 76.887,151.563 cw(c76.385,151.562) 76.385,151.06 66.165,151.06 cw(c66.165,152.25)

## Other copper
Top Layer:
  pour cut-out: 111.612,150.737 cw(c111.612,151.772) 110.577,151.772 cw(c111.612,151.772) 111.612,152.808 cw(c111.612,151.772) 112.648,151.772 cw(c111.612,151.772)
  pour cut-out: 83.35,149.94 cw(c83.35,150.975) 82.315,150.975 cw(c83.35,150.975) 83.35,152.01 cw(c83.35,150.975) 84.385,150.975 cw(c83.35,150.975)
  pour cut-out: 170.975,83.844 cw(c170.975,89.8) 165.019,89.8 cw(c170.975,89.8) 170.975,95.756 cw(c170.975,89.8) 176.931,89.8 cw(c170.975,89.8)
  pour cut-out: 79.975,83.844 cw(c79.975,89.8) 74.019,89.8 cw(c79.975,89.8) 79.975,95.756 cw(c79.975,89.8) 85.931,89.8 cw(c79.975,89.8)
  region net NetFU3_1: 149.424,109.574 cw(c149.212,109.537) 149.419,109.481 149.419,90.09 cw(c146.88,90.09) 146.879,87.55 143.19,87.55 cw(c143.19,90.09) 140.65,90.09 140.65,108.825 cw(c143.395,109.03) 143.19,111.775 147.222,111.775 cw(c146.801,109.165) 149.411,109.587
  region net NetFU2_1: 114.5,108.225 114.5,108.775 cw(c116.687,108.775) 116.687,110.962 120.54,110.962 cw(c120.54,108.222) 123.281,108.222 123.281,90.11 cw(c120.741,90.11) 120.741,87.57 117.065,87.57 cw(c117.065,90.11) 114.525,90.11 114.525,104.05
  region net NetFU1_1: 88.7,89.95 88.7,89.225 ccw(c90.425,89.45) 90.425,87.71 95.507,87.71 ccw(c95.25,89.9) 97.455,89.9 97.455,108.7 ccw(c94.748,109.327) 95.507,112 90.625,112 ccw(c91.312,109.388) 88.7,108.7
  pour cut-out: 152.103,92.999 163.603,92.999 163.603,86.77 152.124,86.77 152.124,92.832
  pour cut-out: 126.103,92.999 137.603,92.999 137.603,86.77 126.124,86.77 126.124,92.832
  pour cut-out: 100.103,92.999 111.603,92.999 111.603,86.77 100.124,86.77 100.124,92.832
  pour cut-out: 108.028,156.454 113.098,156.454 113.098,151.346 108.044,151.346
Bottom Layer:
  pour cut-out: 125.369,126.413 cw(c125.369,130.394) 121.388,130.394 cw(c125.369,130.394) 125.369,134.375 cw(c125.369,130.394) 129.35,130.394 cw(c125.369,130.394)
  pour cut-out: 188.869,126.413 cw(c188.869,130.394) 184.888,130.394 cw(c188.869,130.394) 188.869,134.375 cw(c188.869,130.394) 192.85,130.394 cw(c188.869,130.394)
  pour cut-out: 184.869,168.413 cw(c184.869,172.394) 180.888,172.394 cw(c184.869,172.394) 184.869,176.375 cw(c184.869,172.394) 188.85,172.394 cw(c184.869,172.394)
  pour cut-out: 125.369,171.413 cw(c125.369,175.394) 121.388,175.394 cw(c125.369,175.394) 125.369,179.375 cw(c125.369,175.394) 129.35,175.394 cw(c125.369,175.394)
  pour cut-out: 65.869,168.413 cw(c65.869,172.394) 61.888,172.394 cw(c65.869,172.394) 65.869,176.375 cw(c65.869,172.394) 69.85,172.394 cw(c65.869,172.394)
  pour cut-out: 61.869,126.413 cw(c61.869,130.394) 57.888,130.394 cw(c61.869,130.394) 61.869,134.375 cw(c61.869,130.394) 65.85,130.394 cw(c61.869,130.394)
  pour cut-out: 61.869,126.413 cw(c61.869,130.394) 57.888,130.394 cw(c61.869,130.394) 61.869,134.375 cw(c61.869,130.394) 65.85,130.394 cw(c61.869,130.394)
  region net NetFU2_1: 114.5,108.225 114.5,108.775 cw(c116.687,108.775) 116.687,110.962 120.54,110.962 cw(c120.54,108.222) 123.281,108.222 123.281,90.11 cw(c120.741,90.11) 120.741,87.57 117.065,87.57 cw(c117.065,90.11) 114.525,90.11 114.525,104.05
  region net NetFU3_1: 149.424,109.574 cw(c149.212,109.537) 149.419,109.481 149.419,90.09 cw(c146.88,90.09) 146.879,87.55 143.19,87.55 cw(c143.19,90.09) 140.65,90.09 140.65,108.825 cw(c143.395,109.03) 143.19,111.775 147.222,111.775 cw(c146.801,109.165) 149.411,109.587
  region net NetFU1_1: 88.7,89.95 88.7,89.225 ccw(c90.425,89.45) 90.425,87.71 95.507,87.71 ccw(c95.25,89.9) 97.455,89.9 97.455,108.7 ccw(c94.748,109.327) 95.507,112 90.625,112 ccw(c91.312,109.388) 88.7,108.7
  pour cut-out: 187.625,148.126 187.625,134.194 189.625,134.194 189.625,148.096
  pour cut-out: 182.972,167.768 182.972,148.002 189.625,148.002 189.625,167.783

## Silkscreen, mask and mechanical layers (free items; w line width, h text height)
Top Overlay:
  text "АНГМ.758725.002" at 73.4,175.376 h2.52
Mechanical 1:
  circle w0.013: c184.869,172.394 r1.6
  circle w0.013: c125.369,175.394 r1.6
  circle w0.013: c65.869,172.394 r1.6
  circle w0.013: c61.869,130.394 r1.6
  circle w0.013: c125.369,130.394 r1.6
  circle w0.013: c188.869,130.394 r1.6
  circle w0.013: c184.869,172.394 r1.6
  circle w0.013: c125.369,175.394 r1.6
  circle w0.013: c65.869,172.394 r1.6
  circle w0.006: c187.399,150.274 r0.003
  circle w0.006: c184.859,150.274 r0.003
  circle w0.006: c187.399,152.814 r0.003
  circle w0.006: c184.859,152.814 r0.003
  circle w0.006: c187.399,155.354 r0.003
  circle w0.006: c184.859,155.354 r0.003
  circle w0.006: c187.399,157.894 r0.003
  circle w0.006: c184.859,157.894 r0.003
  circle w0.006: c187.399,160.434 r0.003
  circle w0.006: c184.859,160.434 r0.003
  circle w0.006: c187.399,162.974 r0.003
  circle w0.006: c184.859,162.974 r0.003
  circle w0.006: c187.399,165.514 r0.003
  circle w0.006: c184.859,165.514 r0.003
  lines w0.013: 56.869,125.394 193.869,125.394 193.869,171.394 ; 193.869,90.26 cw(c193.169,90.26) 193.664,89.765 183.497,79.599 cw(c183.002,80.094) 183.002,79.394 67.735,79.394 cw(c67.735,80.094) 67.24,79.599 57.074,89.765 cw(c57.569,90.26) 56.869,90.26 56.869,170.527 56.869,171.394 66.869,181.394 67.735,181.394 183.002,181.394 183.869,181.394 193.869,171.394 ; 193.869,170.527 193.869,171.394 ; 184.63,150.045 185.088,150.503 ; 184.63,150.045 185.088,150.045 ; 184.63,150.045 184.63,150.503 ; 184.63,150.503 185.088,150.045 ; 184.63,150.503 185.088,150.503 ; 184.63,152.585 185.088,153.043 ; 184.63,152.585 185.088,152.585 ; 184.63,152.585 184.63,153.043 ; 184.63,153.043 185.088,152.585 ; 184.63,153.043 185.088,153.043 ; 184.63,155.125 185.088,155.583 ; 184.63,155.125 185.088,155.125 ; 184.63,155.125 184.63,155.583 ; 184.63,155.583 185.088,155.125 ; 184.63,155.583 185.088,155.583 ; 184.63,157.665 185.088,158.123 ; 184.63,157.665 185.088,157.665 ; 184.63,157.665 184.63,158.123 ; 184.63,158.123 185.088,157.665 ; 184.63,158.123 185.088,158.123 ; 184.63,160.205 185.088,160.663 ; 184.63,160.205 185.088,160.205 ; 184.63,160.205 184.63,160.663 ; 184.63,160.663 185.088,160.205 ; 184.63,160.663 185.088,160.663 ; 184.63,162.745 185.088,163.203 ; 184.63,162.745 185.088,162.745 ; 184.63,162.745 184.63,163.203 ; 184.63,163.203 185.088,162.745 ; 184.63,163.203 185.088,163.203 ; 184.63,165.285 185.088,165.743 ; 184.63,165.285 185.088,165.285 ; 184.63,165.285 184.63,165.743 ; 184.63,165.743 185.088,165.285 ; 184.63,165.743 185.088,165.743 ; 185.088,150.045 185.088,150.503 ; 185.088,152.585 185.088,153.043 ; 185.088,155.125 185.088,155.583 ; 185.088,157.665 185.088,158.123 ; 185.088,160.205 185.088,160.663 ; 185.088,162.745 185.088,163.203 ; 185.088,165.285 185.088,165.743 ; 187.17,150.045 187.628,150.503 ; 187.17,150.045 187.628,150.045 ; 187.17,150.045 187.17,150.503 ; 187.17,150.503 187.628,150.045 ; 187.17,150.503 187.628,150.503 ; 187.17,152.585 187.628,153.043 ; 187.17,152.585 187.628,152.585 ; 187.17,152.585 187.17,153.043 ; 187.17,153.043 187.628,152.585 ; 187.17,153.043 187.628,153.043 ; 187.17,155.125 187.628,155.583 ; 187.17,155.125 187.628,155.125 ; 187.17,155.125 187.17,155.583 ; 187.17,155.583 187.628,155.125 ; 187.17,155.583 187.628,155.583 ; 187.17,157.665 187.628,158.123 ; 187.17,157.665 187.628,157.665 ; 187.17,157.665 187.17,158.123 ; 187.17,158.123 187.628,157.665 ; 187.17,158.123 187.628,158.123 ; 187.17,160.205 187.628,160.663 ; 187.17,160.205 187.628,160.205 ; 187.17,160.205 187.17,160.663 ; 187.17,160.663 187.628,160.205 ; 187.17,160.663 187.628,160.663 ; 187.17,162.745 187.628,163.203 ; 187.17,162.745 187.628,162.745 ; 187.17,162.745 187.17,163.203 ; 187.17,163.203 187.628,162.745 ; 187.17,163.203 187.628,163.203 ; 187.17,165.285 187.628,165.743 ; 187.17,165.285 187.628,165.285 ; 187.17,165.285 187.17,165.743 ; 187.17,165.743 187.628,165.285 ; 187.17,165.743 187.628,165.743 ; 187.628,150.045 187.628,150.503 ; 187.628,152.585 187.628,153.043 ; 187.628,155.125 187.628,155.583 ; 187.628,157.665 187.628,158.123 ; 187.628,160.205 187.628,160.663 ; 187.628,162.745 187.628,163.203 ; 187.628,165.285 187.628,165.743
Mechanical 7:
  text "SET2|Superlayer=MechanicalLayer7|Wsuperlayer=MechanicalLayer8|Layergrid=MechanicalLayer9|Werase=MechanicalLayer11|Layermark=MechanicalLayer12|Layerstamp=MechanicalLayer13|Gridline=0,18|Boardline=0,6|Contourpolygonline=0,6|PcbGridStep=1|PcbGridNumbering=False|PcbGridCleareanceAtView=0|PcbGridNumberEach=l4|PcbGridLineEach=l2|PcbGridCountSecondaryStrip=1|PcbGridEnabledStrip=True|PcbGridHorizontal90=False|PcbGridWhiteAreaBeforeText=True|PcbSignalGridEnabled=True|PcbSignalShowBukva=True|RealSignalLayerNames=False|PcbGridTextsEnabledBothSide=l2|PcbGridEnabledBothSide=l2|PcbPolarGridEnabled=False|PcbPolarGridAngleStep=10|PcbPolarGridRadialStep=10|PcbPolarGridCenterPcbGrid=False|SilkShowPad=True|SilkViewName=Слой маркировки|SilkShowHole=True|SilkShowAxis=True|SilkShowBukva=True|SilkShowGrid=False|SolderShowGrid=False|SolderViewName=Слой маски|SolderShowAxis=False|SolderShowBukva=False|MainViewShowGrid=False|Maintoplayer=None|MainViewMinDiameterHoles=2|MainViewUseShapesDrill=False|ShowBukvaOnSboky=True|ShowBukvaViews=True|Density=2,2|CustomHoleSizeFactor=1|PcbDoubleLineHeader=False|DrillTableMergeViaAndPad=False|PcbAccuracy=a4|TableName=Таблица 1|RazrezWidth=100|RealLayerNames=False|RazrezShowBukva=False|RazrezBukva=В-В|Sher=Rz 160|Asstoplayer=MechanicalLayer1|Asstoplayer2=None|Assbottomlayer=MechanicalLayer2|Assbottomlayer2=None|AssMinDiameterHoles=2|AssDim=False|AssMech=False|Ass3DBody=True|AssSilk=False|AssComponentSilk=False|AssFreeSilk=False|AssSmdPads=False|AssGridEnable=False|AssShowBukva=True|Mirror=Horisontal|PcbGridFontSize=5|PcbGridCenterZero=False|TTStampDistance=12|MainFontSize=5|PolyShtrihEnable=True|RegionShtrihEnable=False|PolyStep=2|PcbDrillDrawingGridEnabled=False|PcbDrillDrawingViewName=Слой сверловки|PcbDrillDrawingShowBukva=False|PcbDrillDrawingShowAxis=False|PcbSignalLayersUseDrill=True|PcbSignalLayersUseWhiteHoles=True|PcbSignalLayersUseShapesDrill=False|PcbSignalLayersShowAxis=False|Thinline=0,18|Basicline=0,6" at 0,0.025 h0
  text "2STAMP|Обозначение|АНГМ.758725.002 СБ" at 0,0 h0
  text "2STAMP|Наименование1|Печатная плата ПС" at 0,0 h0
  text "BOASVIADRILLTABLE:none,78740,18,|none,157480,348," at 0,0 h0
  text "2BOASDRILLTABLE:none,393701,Да,10,True,|none,420000,Да,14,True,|none,452756,Да,2,True,|none,669291,Да,7,True,|none,1141732,Да,12,True,|none,1259843,Да,6,True,|none,1771654,Да,2,True," at 0,0 h0